# Altium PCB HONGGAN_拼版.PcbDoc (part 5 of 5)
Units mm, origin at the board's own origin, x right, y up, seen from the top; angles counter-clockwise.
Board outline 106.01 x 72.01 mm, 4 copper layers (Top Layer, Mid-Layer 1, Mid-Layer 2, Bottom Layer); 400 components, 0 nets, 1244 pads, 3211 vias.
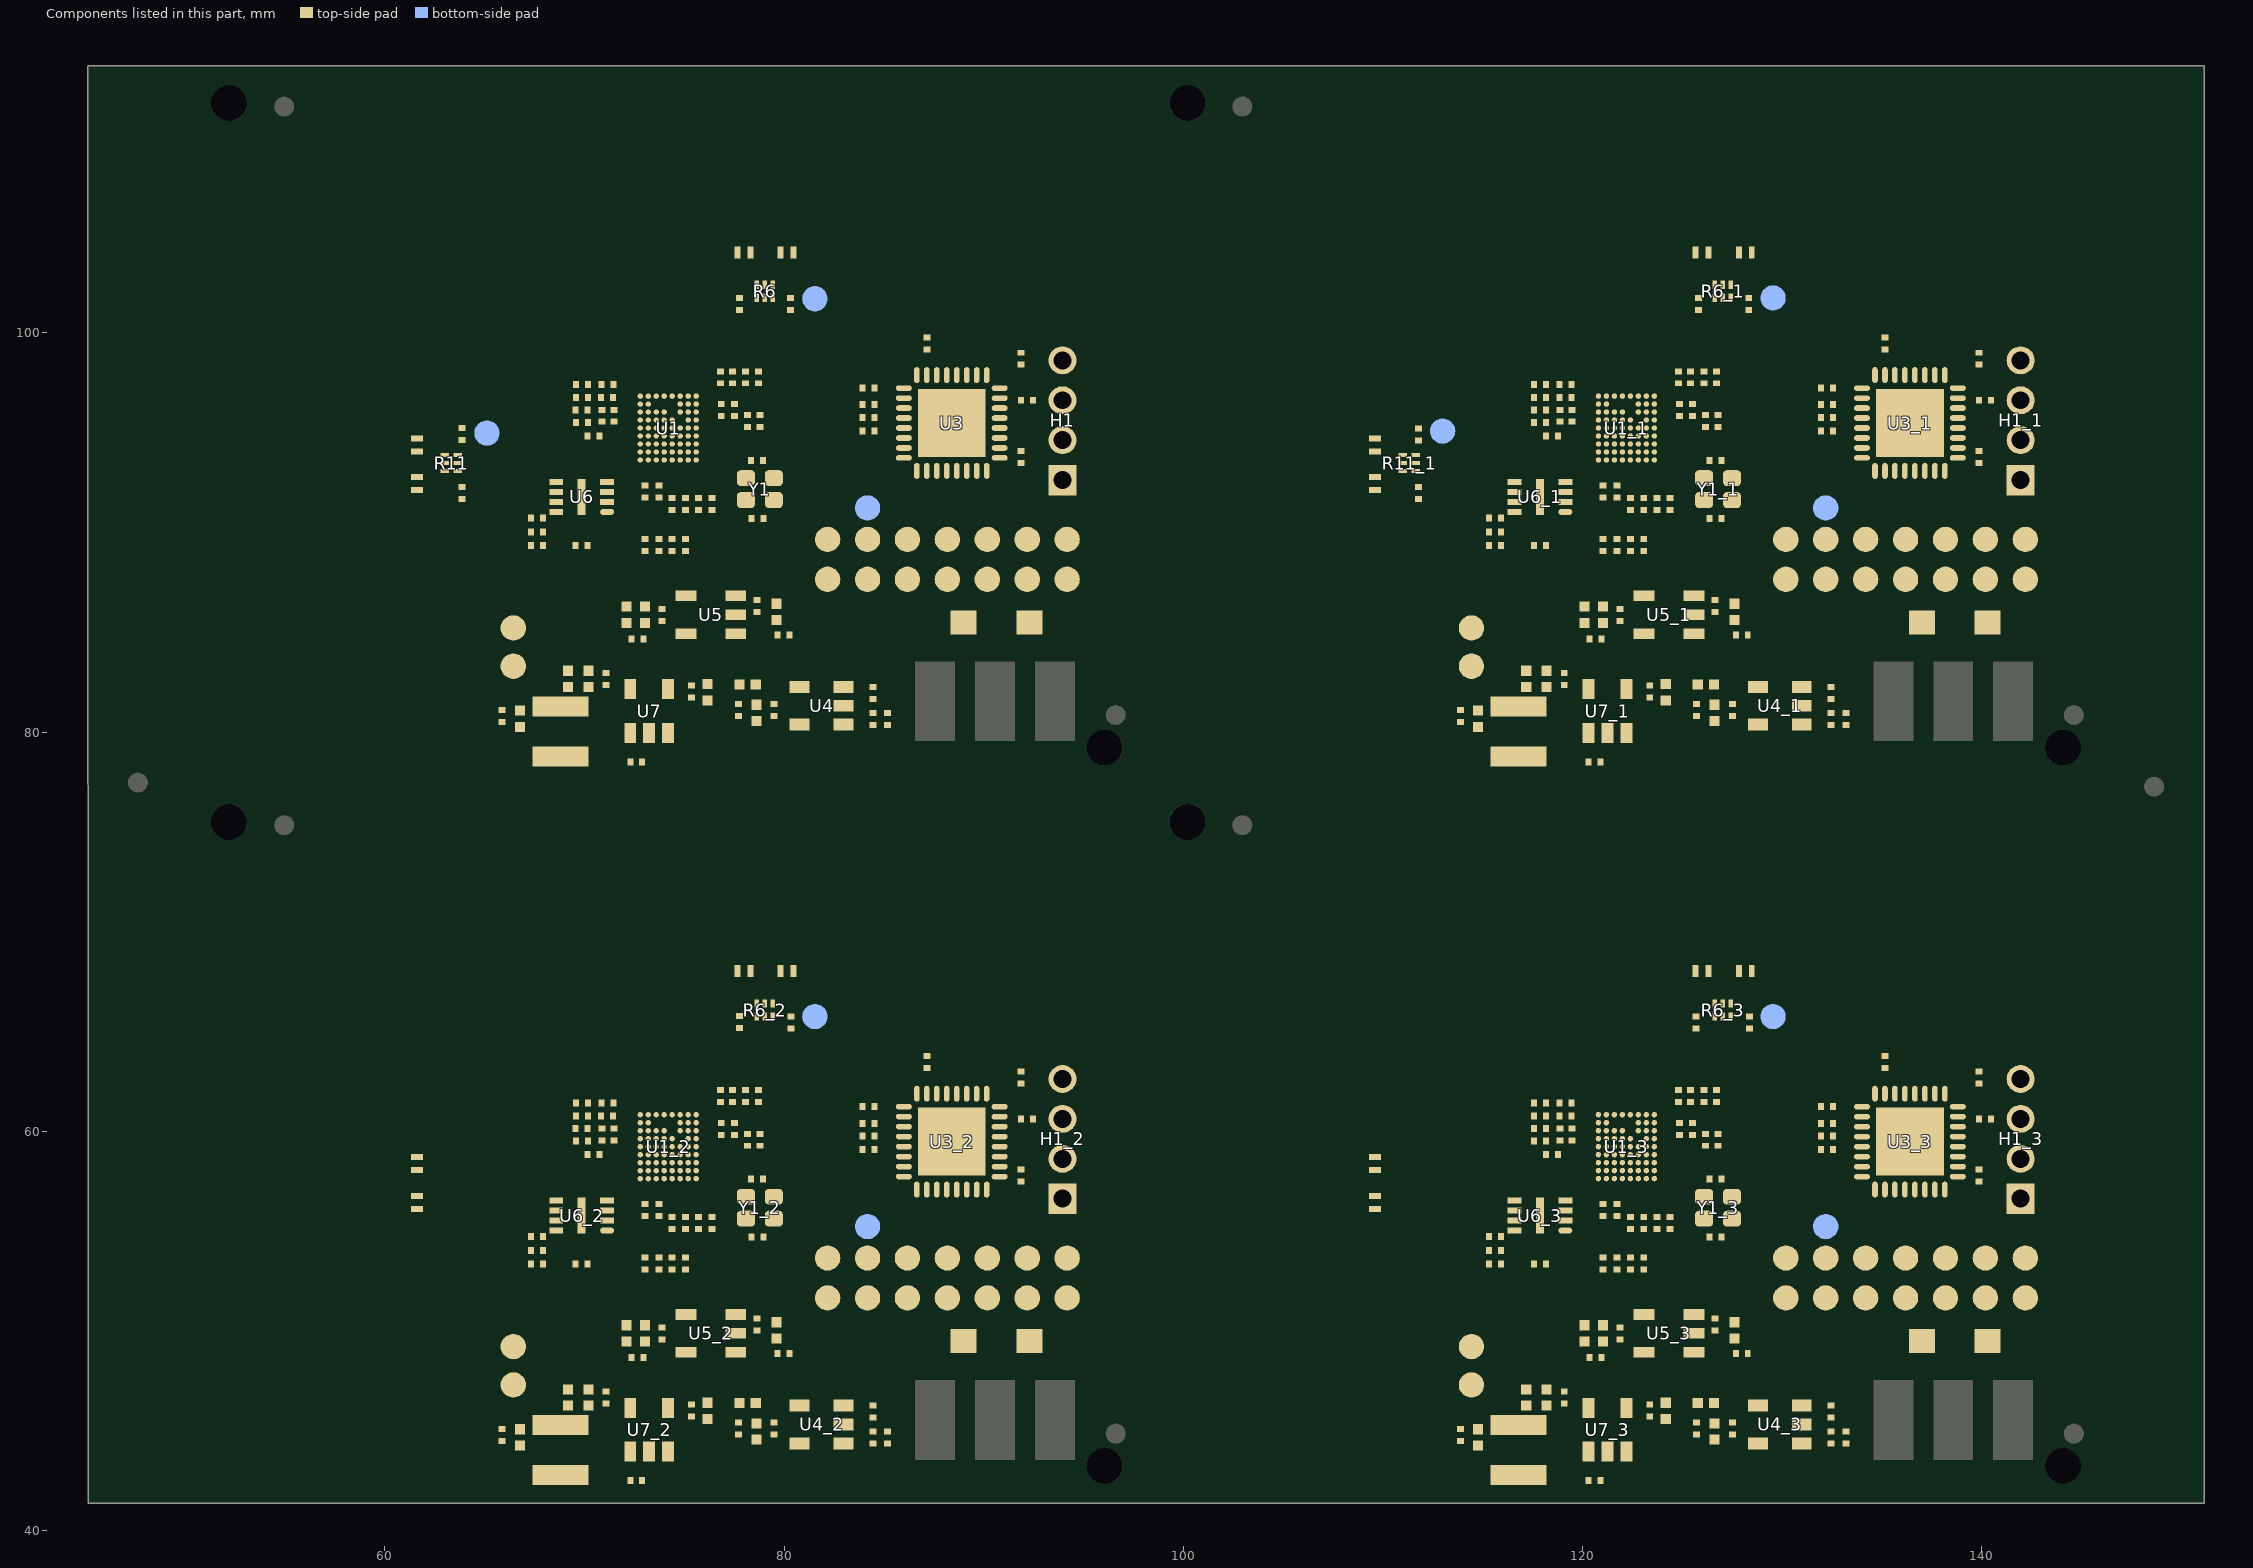
[diagram p7: the components of this part, seen from the top]

## Polygon pours and split planes (outlines as drawn) (continued)
no net on Bottom Layer "NONET_L-01_P-001" (solid, pour order 6): 100.644,96.368 111.644,96.368 111.644,102.868 100.644,102.868
no net on Bottom Layer "NONET_L-01_P-001" (solid, pour order 5): 100.644,78.968 111.644,78.968 111.644,85.468 100.644,85.468
no net on Bottom Layer "NONET_L-01_P-001" (solid, pour order 4): 131.837,105.297 142.837,105.297 142.837,111.797 131.837,111.797

## Other copper
Top Layer:
  rectangle: 130.274,58.112 131.593,58.851
  rectangle: 139.367,55.743 140.627,57.634
  rectangle: 118.413,61.942 119.806,62.791
  rectangle: 126.45,61.815 127.934,62.478
  rectangle: 82.274,58.112 83.593,58.851
  rectangle: 91.367,55.743 92.627,57.634
  rectangle: 70.413,61.942 71.806,62.791
  rectangle: 78.45,61.815 79.934,62.478
  rectangle: 130.274,94.112 131.593,94.851
  rectangle: 139.367,91.743 140.627,93.634
  rectangle: 118.413,97.942 119.806,98.791
  rectangle: 126.45,97.815 127.934,98.478
  rectangle: 82.274,94.112 83.593,94.851
  rectangle: 91.367,91.743 92.627,93.634
  rectangle: 70.413,97.942 71.806,98.791
  rectangle: 78.45,97.815 79.934,98.478
  region: 130.476,44.504 130.476,43.543 136.567,43.543 136.567,44.504
  region: 125.054,49.192 126.68,49.192 127.362,49.874 127.87,49.874 127.87,48.099 125.054,48.099
  region: 124.895,44.87 129.278,44.87 129.278,43.654 124.895,43.654
  region: 120.775,49.724 120.796,49.703 120.796,47.718 123.599,47.718 123.599,49.724
  region: 117.939,46.517 118.73,46.517 119.23,46.517 119.23,45.717 118.88,45.717 118.552,45.39 118.552,44.926 113.24,44.926 113.24,45.686 117.939,45.686
  pour cut-out: 134.307,57.321 134.307,61.584 138.471,61.584 138.471,57.321
  region: 121.891,46.651 122.491,46.651 122.491,46.573 123.218,45.846 123.908,45.846 124.416,45.846 124.416,45.338 124.895,44.87 124.895,43.654 124.487,43.654 122.491,45.65 121.891,45.65
  pour cut-out: 117.857,59.92 119.82,59.908 119.823,59.744 117.859,59.761
  pour cut-out: 125.841,60.122 125.841,60.164 126.202,60.213 126.391,60.193 126.428,60.201
  pour cut-out: 115.616,55.401 115.606,55.057 115.814,55.057 115.93,55.115 115.945,55.232 115.84,55.297 115.604,55.428
  pour cut-out: 119.805,54.866 120.568,55.629 120.695,55.59 120.695,55.449 120.657,55.334 120.313,54.99 120.257,54.906
  pour cut-out: 124.432,60.163 124.35,60.078 124.341,60.056 124.628,59.769 124.638,60.121
  pour cut-out: 119.06,59.16 119.06,59.101 119.119,59.101 119.128,59.092 119.407,59.092 119.463,59.148
  region: 82.476,44.504 82.476,43.543 88.567,43.543 88.567,44.504
  region: 77.054,49.192 78.68,49.192 79.362,49.874 79.87,49.874 79.87,48.099 77.054,48.099
  region: 76.895,44.87 81.278,44.87 81.278,43.654 76.895,43.654
  region: 72.775,49.724 72.796,49.703 72.796,47.718 75.599,47.718 75.599,49.724
  region: 69.939,46.517 70.73,46.517 71.23,46.517 71.23,45.717 70.88,45.717 70.552,45.39 70.552,44.926 65.24,44.926 65.24,45.686 69.939,45.686
  pour cut-out: 86.307,57.321 86.307,61.584 90.471,61.584 90.471,57.321
  region: 73.891,46.651 74.491,46.651 74.491,46.573 75.218,45.846 75.908,45.846 76.416,45.846 76.416,45.338 76.895,44.87 76.895,43.654 76.487,43.654 74.491,45.65 73.891,45.65
  pour cut-out: 69.857,59.92 71.82,59.908 71.823,59.744 69.859,59.761
  pour cut-out: 77.841,60.122 77.841,60.164 78.202,60.213 78.391,60.193 78.428,60.201
  pour cut-out: 67.616,55.401 67.606,55.057 67.814,55.057 67.93,55.115 67.945,55.232 67.84,55.297 67.604,55.428
  pour cut-out: 71.805,54.866 72.568,55.629 72.695,55.59 72.695,55.449 72.657,55.334 72.313,54.99 72.257,54.906
  pour cut-out: 76.432,60.163 76.35,60.078 76.341,60.056 76.628,59.769 76.638,60.121
  pour cut-out: 71.06,59.16 71.06,59.101 71.119,59.101 71.128,59.092 71.407,59.092 71.463,59.148
  region: 130.476,80.504 130.476,79.543 136.567,79.543 136.567,80.504
  region: 125.054,85.192 126.68,85.192 127.362,85.874 127.87,85.874 127.87,84.099 125.054,84.099
  region: 124.895,80.87 129.278,80.87 129.278,79.654 124.895,79.654
  region: 120.775,85.724 120.796,85.703 120.796,83.718 123.599,83.718 123.599,85.724
  region: 117.939,82.517 118.73,82.517 119.23,82.517 119.23,81.717 118.88,81.717 118.552,81.39 118.552,80.926 113.24,80.926 113.24,81.686 117.939,81.686
  pour cut-out: 134.307,93.321 134.307,97.584 138.471,97.584 138.471,93.321
  region: 121.891,82.651 122.491,82.651 122.491,82.573 123.218,81.846 123.908,81.846 124.416,81.846 124.416,81.338 124.895,80.87 124.895,79.654 124.487,79.654 122.491,81.65 121.891,81.65
  pour cut-out: 117.857,95.92 119.82,95.908 119.823,95.744 117.859,95.761
  pour cut-out: 125.841,96.122 125.841,96.164 126.202,96.213 126.391,96.193 126.428,96.201
  pour cut-out: 115.616,91.401 115.606,91.057 115.814,91.057 115.93,91.115 115.945,91.232 115.84,91.297 115.604,91.428
  pour cut-out: 119.805,90.866 120.568,91.629 120.695,91.59 120.695,91.449 120.657,91.334 120.313,90.99 120.257,90.906
  pour cut-out: 124.432,96.163 124.35,96.078 124.341,96.056 124.628,95.769 124.638,96.121
  pour cut-out: 119.06,95.16 119.06,95.101 119.119,95.101 119.128,95.092 119.407,95.092 119.463,95.148
  region: 82.476,80.504 82.476,79.543 88.567,79.543 88.567,80.504
  region: 77.054,85.192 78.68,85.192 79.362,85.874 79.87,85.874 79.87,84.099 77.054,84.099
  region: 76.895,80.87 81.278,80.87 81.278,79.654 76.895,79.654
  region: 72.775,85.724 72.796,85.703 72.796,83.718 75.599,83.718 75.599,85.724
  region: 69.939,82.517 70.73,82.517 71.23,82.517 71.23,81.717 70.88,81.717 70.552,81.39 70.552,80.926 65.24,80.926 65.24,81.686 69.939,81.686
  pour cut-out: 86.307,93.321 86.307,97.584 90.471,97.584 90.471,93.321
  region: 73.891,82.651 74.491,82.651 74.491,82.573 75.218,81.846 75.908,81.846 76.416,81.846 76.416,81.338 76.895,80.87 76.895,79.654 76.487,79.654 74.491,81.65 73.891,81.65
  pour cut-out: 69.857,95.92 71.82,95.908 71.823,95.744 69.859,95.761
  pour cut-out: 77.841,96.122 77.841,96.164 78.202,96.213 78.391,96.193 78.428,96.201
  pour cut-out: 67.616,91.401 67.606,91.057 67.814,91.057 67.93,91.115 67.945,91.232 67.84,91.297 67.604,91.428
  pour cut-out: 71.805,90.866 72.568,91.629 72.695,91.59 72.695,91.449 72.657,91.334 72.313,90.99 72.257,90.906
  pour cut-out: 76.432,96.163 76.35,96.078 76.341,96.056 76.628,95.769 76.638,96.121
  pour cut-out: 71.06,95.16 71.06,95.101 71.119,95.101 71.128,95.092 71.407,95.092 71.463,95.148
Mid-Layer 2:
  rectangle: 126.575,43.654 127.918,48.486
  rectangle: 130.274,58.112 131.593,58.851
  rectangle: 139.367,55.743 140.627,57.634
  rectangle: 118.413,61.776 119.806,62.791
  rectangle: 126.45,61.815 127.934,62.478
  rectangle: 78.575,43.654 79.918,48.486
  rectangle: 82.274,58.112 83.593,58.851
  rectangle: 91.367,55.743 92.627,57.634
  rectangle: 70.413,61.776 71.806,62.791
  rectangle: 78.45,61.815 79.934,62.478
  rectangle: 126.575,79.654 127.918,84.486
  rectangle: 130.274,94.112 131.593,94.851
  rectangle: 139.367,91.743 140.627,93.634
  rectangle: 118.413,97.776 119.806,98.791
  rectangle: 126.45,97.815 127.934,98.478
  rectangle: 78.575,79.654 79.918,84.486
  rectangle: 82.274,94.112 83.593,94.851
  rectangle: 91.367,91.743 92.627,93.634
  rectangle: 70.413,97.776 71.806,98.791
  rectangle: 78.45,97.815 79.934,98.478
  region: 120.775,49.724 120.796,49.703 120.796,47.718 123.599,47.718 123.599,49.724
  region: 124.895,44.87 127.918,44.87 127.918,43.654 124.895,43.654
  region: 113.367,45.655 120.718,45.655 120.718,44.972 119.022,44.972 113.367,44.972
  pour cut-out: 100.294,42.618 100.294,49.818 111.994,49.818 111.994,42.618
  pour cut-out: 100.294,60.018 100.294,67.218 111.994,67.218 111.994,60.018
  pour cut-out: 113.876,68.947 113.876,76.147 125.576,76.147 125.576,68.947
  pour cut-out: 131.487,68.947 131.487,76.147 143.187,76.147 143.187,68.947
  region: 72.775,49.724 72.796,49.703 72.796,47.718 75.599,47.718 75.599,49.724
  region: 76.895,44.87 79.918,44.87 79.918,43.654 76.895,43.654
  region: 65.367,45.655 72.718,45.655 72.718,44.972 71.022,44.972 65.367,44.972
  pour cut-out: 53.794,60.018 53.794,67.218 62.494,67.218 62.494,60.018
  pour cut-out: 53.794,42.618 53.794,49.818 62.494,49.818 62.494,42.618
  pour cut-out: 67.376,68.947 67.376,76.147 76.076,76.147 76.076,68.947
  pour cut-out: 84.987,68.947 84.987,76.147 93.687,76.147 93.687,68.947
  region: 120.775,85.724 120.796,85.703 120.796,83.718 123.599,83.718 123.599,85.724
  region: 124.895,80.87 127.918,80.87 127.918,79.654 124.895,79.654
  region: 113.367,81.655 120.718,81.655 120.718,80.972 119.022,80.972 113.367,80.972
  pour cut-out: 100.294,78.618 111.994,78.618 111.994,85.818 100.294,85.818
  pour cut-out: 100.294,96.018 111.994,96.018 111.994,103.218 100.294,103.218
  pour cut-out: 113.876,104.947 125.576,104.947 125.576,112.147 113.876,112.147
  pour cut-out: 131.487,104.947 143.187,104.947 143.187,112.147 131.487,112.147
  region: 72.775,85.724 72.796,85.703 72.796,83.718 75.599,83.718 75.599,85.724
  region: 76.895,80.87 79.918,80.87 79.918,79.654 76.895,79.654
  region: 65.367,81.655 72.718,81.655 72.718,80.972 71.022,80.972 65.367,80.972
  pour cut-out: 53.794,96.018 62.494,96.018 62.494,103.218 53.794,103.218
  pour cut-out: 67.376,104.947 76.076,104.947 76.076,112.147 67.376,112.147
  pour cut-out: 84.987,104.947 93.687,104.947 93.687,112.147 84.987,112.147
  pour cut-out: 53.794,78.618 62.494,78.618 62.494,85.818 53.794,85.818
Bottom Layer:
  pour cut-out: 103.644,49.218 104.144,49.218 104.144,48.218 108.144,48.218 108.144,49.218 108.644,49.218 108.644,47.718 103.644,47.718
  pour cut-out: 103.644,66.618 104.144,66.618 104.144,65.618 108.144,65.618 108.144,66.618 108.644,66.618 108.644,65.118 103.644,65.118
  pour cut-out: 117.226,74.047 122.226,74.047 122.226,75.547 121.726,75.547 121.726,74.547 117.726,74.547 117.726,75.547 117.226,75.547
  pour cut-out: 134.837,74.047 139.837,74.047 139.837,75.547 139.337,75.547 139.337,74.547 135.337,74.547 135.337,75.547 134.837,75.547
  pour cut-out: 100.294,42.618 100.294,49.818 111.994,49.818 111.994,42.618
  pour cut-out: 100.294,60.018 100.294,67.218 111.994,67.218 111.994,60.018
  pour cut-out: 113.876,68.947 113.876,76.147 125.576,76.147 125.576,68.947
  pour cut-out: 131.487,68.947 131.487,76.147 143.187,76.147 143.187,68.947
  pour cut-out: 53.794,60.018 54.644,60.018 54.644,63.233 61.644,63.233 61.644,60.018 62.494,60.018 62.494,67.218 61.644,67.218 61.644,64.003 54.644,64.003 54.644,67.218 53.794,67.218
  pour cut-out: 67.376,68.947 68.226,68.947 68.226,72.162 75.226,72.162 75.226,68.947 76.076,68.947 76.076,76.147 75.226,76.147 75.226,72.932 68.226,72.932 68.226,76.147 67.376,76.147
  pour cut-out: 84.987,68.947 85.837,68.947 85.837,72.162 92.837,72.162 92.837,68.947 93.687,68.947 93.687,76.147 92.837,76.147 92.837,72.932 85.837,72.932 85.837,76.147 84.987,76.147
  pour cut-out: 53.794,42.618 54.644,42.618 54.644,45.833 61.644,45.833 61.644,42.618 62.494,42.618 62.494,49.818 61.644,49.818 61.644,46.603 54.644,46.603 54.644,49.818 53.794,49.818
  pour cut-out: 103.644,85.218 104.144,85.218 104.144,84.218 108.144,84.218 108.144,85.218 108.644,85.218 108.644,83.718 103.644,83.718
  pour cut-out: 103.644,102.618 104.144,102.618 104.144,101.618 108.144,101.618 108.144,102.618 108.644,102.618 108.644,101.118 103.644,101.118
  pour cut-out: 117.226,110.047 122.226,110.047 122.226,111.547 121.726,111.547 121.726,110.547 117.726,110.547 117.726,111.547 117.226,111.547
  pour cut-out: 134.837,110.047 139.837,110.047 139.837,111.547 139.337,111.547 139.337,110.547 135.337,110.547 135.337,111.547 134.837,111.547
  pour cut-out: 100.294,78.611 111.994,78.611 112,78.618 112,85.818 111.994,85.824 100.294,85.824 100.287,85.818
  pour cut-out: 100.3,96.024 100.3,103.211 111.987,103.211 111.987,96.024
  pour cut-out: 113.882,104.953 113.882,112.14 125.569,112.14 125.569,104.953
  pour cut-out: 131.494,104.953 131.494,112.14 143.18,112.14 143.18,104.953
  pour cut-out: 53.794,78.618 54.644,78.618 54.644,81.818 61.644,81.818 61.644,78.618 62.494,78.618 62.494,85.818 61.644,85.818 61.644,82.618 54.644,82.618 54.644,85.818 53.794,85.818
  pour cut-out: 54.644,96.018 54.644,99.218 61.644,99.218 61.644,96.018 62.494,96.018 62.494,103.218 61.644,103.218 61.644,100.018 54.644,100.018 54.644,103.218 53.794,103.218 53.794,96.018
  pour cut-out: 68.226,104.947 68.226,108.147 75.226,108.147 75.226,104.947 76.076,104.947 76.076,112.147 75.226,112.147 75.226,108.947 68.226,108.947 68.226,112.147 67.376,112.147 67.376,104.947
  pour cut-out: 92.837,104.947 93.687,104.947 93.687,112.147 92.837,112.147 92.837,108.947 85.837,108.947 85.837,112.147 84.987,112.147 84.987,104.947 85.837,104.947 85.837,108.147 92.837,108.147

## Silkscreen, mask and mechanical layers (free items; w line width, h text height)
Bottom Solder:
  region: 100.294,60.018 100.294,67.218 111.994,67.218 111.994,60.018
  region: 113.876,68.947 113.876,76.147 125.576,76.147 125.576,68.947
  region: 131.487,68.947 131.487,76.147 143.187,76.147 143.187,68.947
  region: 100.294,42.618 100.294,49.818 111.994,49.818 111.994,42.618
  region: 53.794,60.018 62.494,60.018 62.494,67.218 53.794,67.218
  region: 67.376,68.947 76.076,68.947 76.076,76.147 67.376,76.147
  region: 84.987,68.947 93.687,68.947 93.687,76.147 84.987,76.147
  region: 53.794,42.618 62.494,42.618 62.494,49.818 53.794,49.818
  region: 100.294,96.018 100.294,103.218 111.994,103.218 111.994,96.018
  region: 113.876,104.947 113.876,112.147 125.576,112.147 125.576,104.947
  region: 131.487,104.947 131.487,112.147 143.187,112.147 143.187,104.947
  region: 100.294,78.618 100.294,85.818 111.994,85.818 111.994,78.618
  region: 53.794,78.618 62.494,78.618 62.494,85.818 53.794,85.818
  region: 53.794,96.018 62.494,96.018 62.494,103.218 53.794,103.218
  region: 67.376,104.947 76.076,104.947 76.076,112.147 67.376,112.147
  region: 84.987,104.947 93.687,104.947 93.687,112.147 84.987,112.147
Mechanical 1:
  lines w0.013: 48.514,113.368 45.127,113.368 45.13,41.368 96.13,41.368 ; 48.768,113.368 52.832,113.368 ; 50.127,41.368 50.127,103.218 50.127,110.109 ; 50.127,43.368 ccw(c52.127,43.368) 52.127,41.368 ; 50.127,75.368 cw(c52.127,75.368) 52.127,77.368 ; 50.127,79.368 ccw(c52.127,79.368) 52.127,77.368 ; 50.127,110.363 50.127,113.368 ; 50.127,111.368 cw(c52.127,111.368) 52.127,113.368 ; 53.086,113.368 96.127,113.368 cw(c96.127,111.368) 98.127,111.368 ; 96.127,41.368 ccw(c96.127,43.368) 98.127,43.368 ; 100.12,113.368 151.12,113.368 151.127,41.368 100.127,41.368 cw(c100.127,43.368) 98.127,43.368 ; 100.127,113.368 ccw(c100.127,111.368) 98.127,111.368 ; 144.127,41.368 ccw(c144.127,43.368) 146.127,43.368 ; 144.127,113.368 cw(c144.127,111.368) 146.127,111.368 ; 146.127,41.368 146.127,103.218 146.127,113.368 ; 146.127,75.368 ccw(c144.127,75.368) 144.127,77.368 ; 146.127,79.368 cw(c144.127,79.368) 144.127,77.368 ; 52.127,77.368 96.127,77.368 ; 52.127,77.368 96.127,77.368 ; 96.127,77.368 cw(c96.127,75.368) 98.127,75.368 ; 96.127,77.368 ccw(c96.127,79.368) 98.127,79.368 ; 98.127,43.368 98.127,75.368 ; 98.127,43.368 98.127,75.368 ; 98.127,75.368 cw(c100.127,75.368) 100.127,77.368 ; 98.127,79.368 ccw(c100.127,79.368) 100.127,77.368 ; 98.127,79.368 98.127,111.368 ; 98.127,79.368 98.127,111.368 ; 100.127,77.368 144.127,77.368 ; 100.127,77.368 144.127,77.368
Mechanical 2:
  drawing of 324 lines, arcs and shapes, not listed
Mechanical 3:
  drawing of 2565 lines, arcs and shapes, not listed
Mechanical 4:
  drawing of 190 lines, arcs and shapes, not listed
Mechanical 5:
  drawing of 3628 lines, arcs and shapes, not listed